# Altium PCB RF_v2.PcbDoc (part 1 of 4)
Units mm, origin at the board's own origin, x right, y up, seen from the top; angles counter-clockwise.
Board outline 203.1 x 72.1 mm, 2 copper layers (Top Layer, Bottom Layer), stack 1.535 mm thick; 384 components, 237 nets, 1087 pads, 1621 vias.
Unrouted connection lines stored in the file: 4.
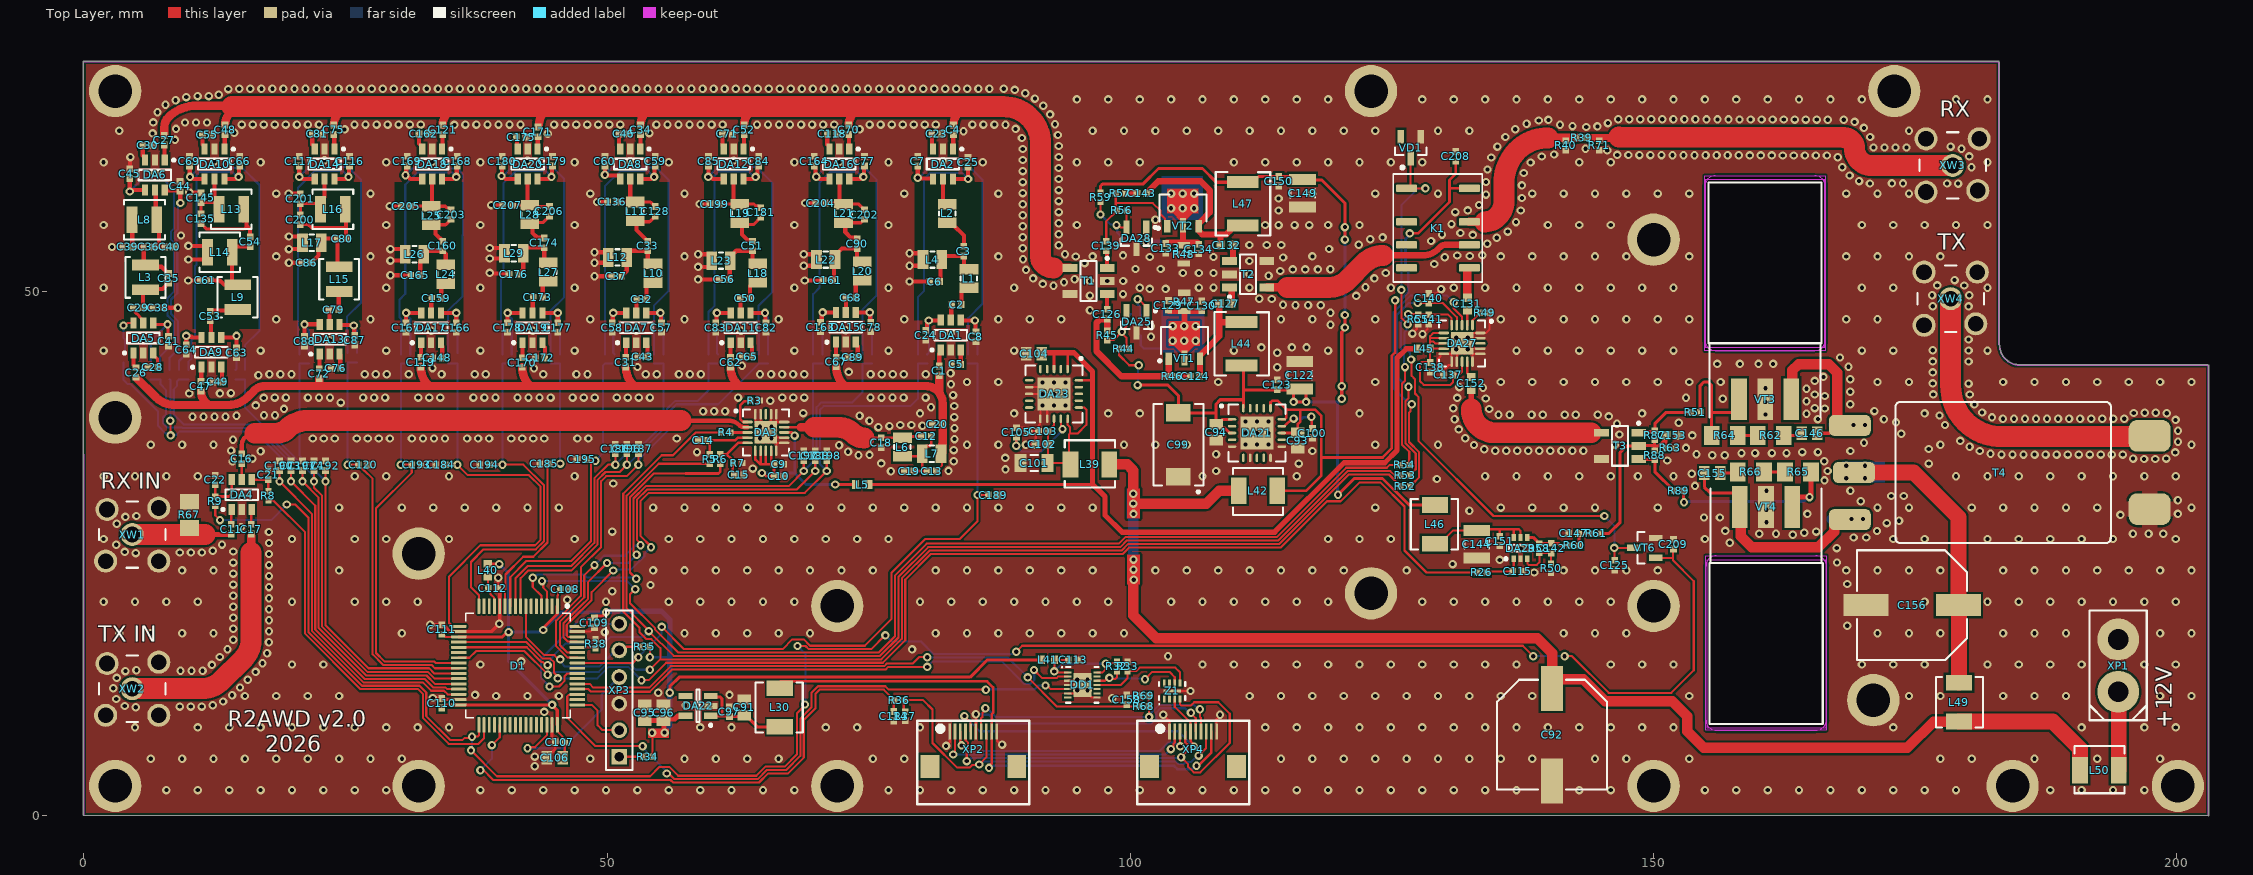
[diagram p0: Top Layer view]
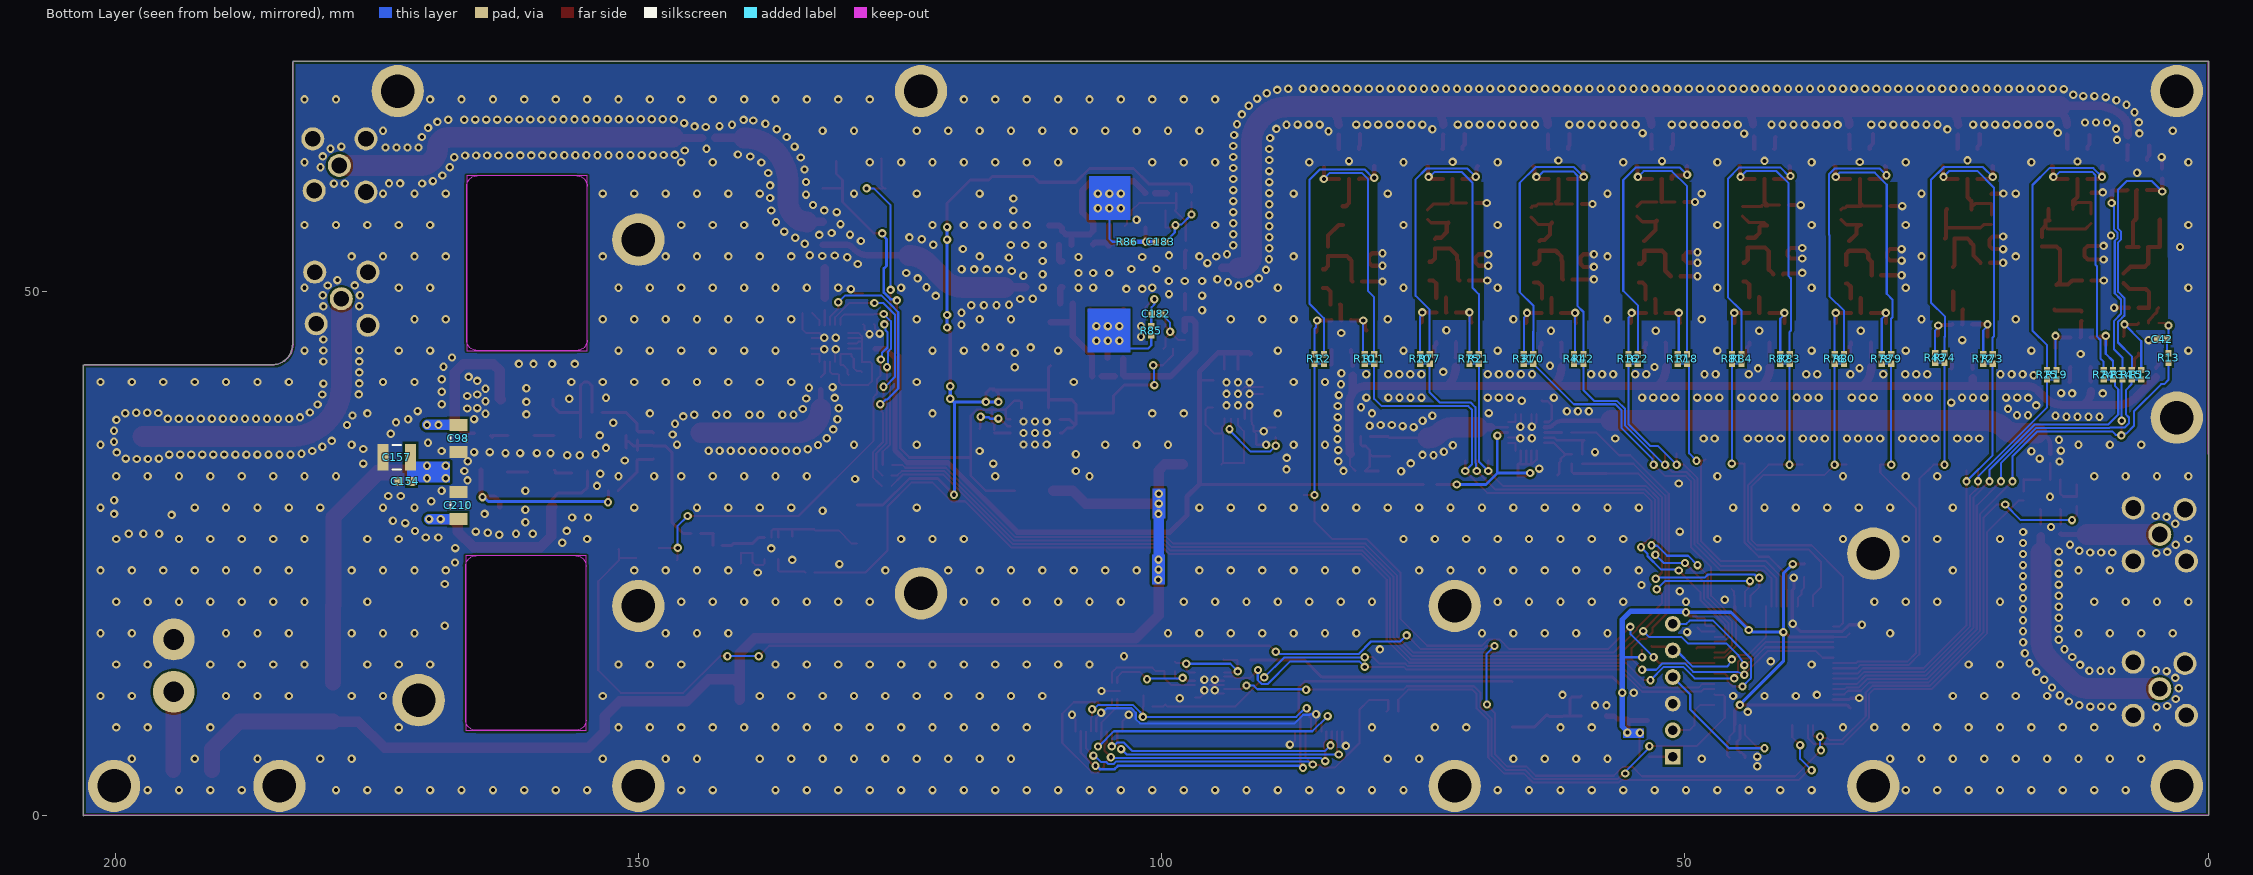
[diagram p1: Bottom Layer view, seen from below]
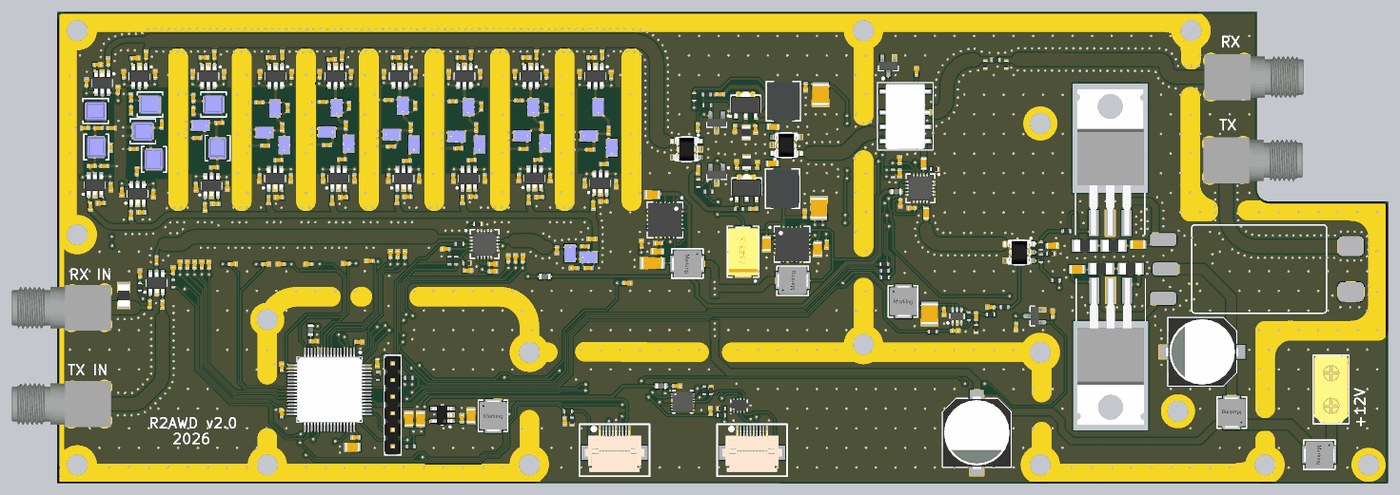
[diagram p4: 3D render of the assembled board from above, using the file's embedded part models]
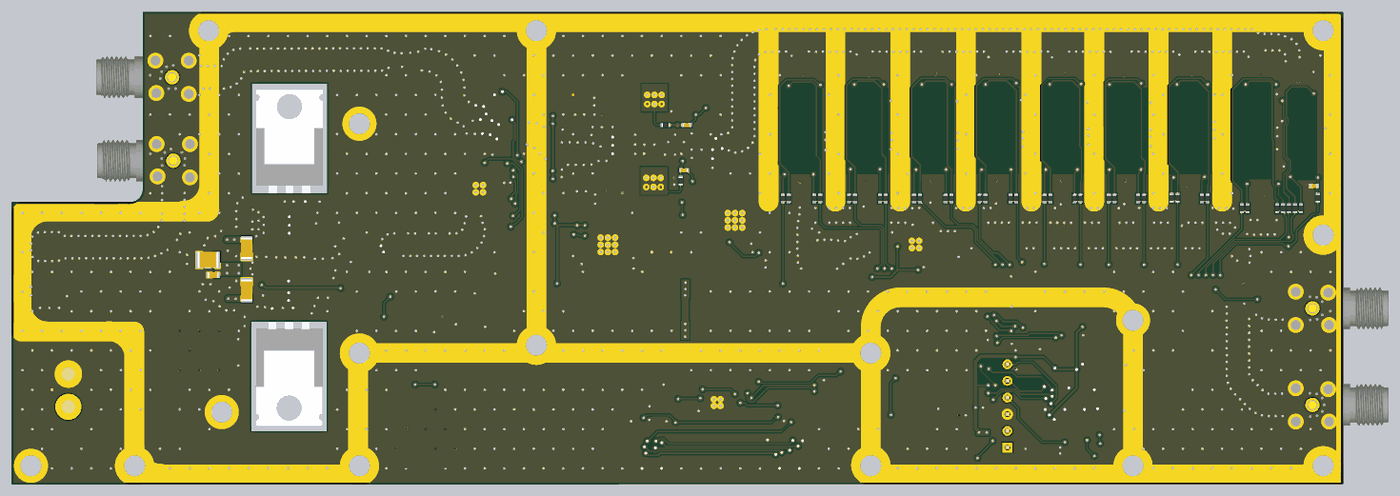
[diagram p5: 3D render of the assembled board from below, using the file's embedded part models]

## Layer stack, top to bottom
Top Solder: solder mask 0.0102, Solder Resist, Dk 3.5
Top Layer: signal copper 0.0175
Dielectric 1: dielectric 1.5, FR-4, Dk 4.8
Bottom Layer: signal copper 0.0175
Bottom Solder: solder mask 0.0102, Solder Resist, Dk 3.5

## Board outline
-0.05,0 -0.05,34.5 -0.05,72 0,72.05 183,72.05 183.05,71.981 183.05,45 ccw(c185,45) 185,43.05 202.946,43.05 203.05,43 203.05,0 202.999,-0.05
cut-out: 166.5,24.8 166.5,8.1 155,8.1 155,24.8
cut-out: 154.9,61.1 166.4,61.1 166.4,44.4 154.9,44.4

## Design rules (kind name [scope] priority, off if disabled: settings)
Clearance [All] p1: gap=0.125 ignorepadtopadclearanceinfootprint=FALSE except(0.2: Arc-Fill Arc-Poly Arc-Region Track-Fill Track-Poly Track-Region SMDPad-Fill SMDPad-Poly SMDPad-Region THPad-Fill THPad-Poly THPad-Region Via-Fill Via-Poly Via-Region Fill-Fill Fill-Poly Fill-Region Poly-Poly Poly-Region Region-Region)
HoleSize [All] p1: absolutevalues=TRUE maxlimit=5 minlimit=0.025 maxpercent=80.000 minpercent=20.000
PolygonConnect [All] p1: connectstyle=Direct reliefconductorwidth=0.254 reliefentries=4 polygonreliefangle="90 Angle" airgapwidth=0.254
RoutingVias [All] p1: holewidth=0.4 width=0.8 viastyle="Through Hole" minholewidth=0.3 minwidth=0.7 maxholewidth=4 maxwidth=6
SolderMaskExpansion [All] p1: expansion=0.102 istentingtop=FALSE
SupplyNets "Schematic Supply Nets_42" [InNet('IN_5V')] p1: voltage=0.000
SupplyNets "Schematic Supply Nets_31" [InNet('VDD_12VRF')] p2: voltage=0.000
SupplyNets "Schematic Supply Nets_41" [InNet('RELAY_TX')] p3: voltage=0.000
SupplyNets "Schematic Supply Nets_40" [InNet('BAND5_DIS')] p4: voltage=0.000
SupplyNets "Schematic Supply Nets_39" [InNet('BAND1_DIS')] p5: voltage=0.000
SupplyNets "Schematic Supply Nets_38" [InNet('BAND7_DIS')] p6: voltage=0.000
SupplyNets "Schematic Supply Nets_37" [InNet('BPF_IN')] p7: voltage=0.000
SupplyNets "Schematic Supply Nets_36" [InNet('BAND0_DIS')] p8: voltage=0.000
SupplyNets "Schematic Supply Nets_35" [InNet('BAND8_DIS')] p9: voltage=0.000
SupplyNets "Schematic Supply Nets_34" [InNet('BAND2_DIS')] p10: voltage=0.000
SupplyNets "Schematic Supply Nets_33" [InNet('BAND3_DIS')] p11: voltage=0.000
SupplyNets "Schematic Supply Nets_32" [InNet('BAND4_DIS')] p12: voltage=0.000
SupplyNets "Schematic Supply Nets_14" [InNet('BAND6_DIS')] p13: voltage=0.000
SupplyNets "Schematic Supply Nets_30" [InNet('DAC_DRV')] p14: voltage=0.000
SupplyNets "Schematic Supply Nets_29" [InNet('BAND3_EN')] p15: voltage=0.000
SupplyNets "Schematic Supply Nets_28" [InNet('VDD_RFIN')] p16: voltage=0.000
SupplyNets "Schematic Supply Nets_27" [InNet('CON_RS422B')] p17: voltage=0.000
SupplyNets "Schematic Supply Nets_26" [InNet('BAND8_EN')] p18: voltage=0.000
SupplyNets "Schematic Supply Nets_25" [InNet('BAND6_EN')] p19: voltage=0.000
SupplyNets "Schematic Supply Nets_24" [InNet('CON_RS422Z')] p20: voltage=0.000
SupplyNets "Schematic Supply Nets_23" [InNet('BAND1_EN')] p21: voltage=0.000
SupplyNets "Schematic Supply Nets_22" [InNet('RF_3V3')] p22: voltage=0.000
SupplyNets "Schematic Supply Nets_21" [InNet('BPF_OUT')] p23: voltage=0.000
SupplyNets "Schematic Supply Nets_20" [InNet('TX_EN')] p24: voltage=0.000
SupplyNets "Schematic Supply Nets_19" [InNet('DRV_IN')] p25: voltage=0.000
SupplyNets "Schematic Supply Nets_17" [InNet('ATT_LE0')] p26: voltage=0.000
SupplyNets "Schematic Supply Nets_16" [InNet('VDD_12V')] p27: voltage=0.000
SupplyNets "Schematic Supply Nets_15" [InNet('CON_TX_FAIL')] p28: voltage=0.000
SupplyNets "Schematic Supply Nets_13" [InNet('VDD_3V3')] p29: voltage=0.000
SupplyNets "Schematic Supply Nets_12" [InNet('BAND2_EN')] p30: voltage=0.000
SupplyNets "Schematic Supply Nets_11" [InNet('CON_TXON')] p31: voltage=0.000
SupplyNets "Schematic Supply Nets_10" [InNet('CON_RS422Y')] p32: voltage=0.000
SupplyNets "Schematic Supply Nets_9" [InNet('GND')] p33: voltage=0.000
SupplyNets "Schematic Supply Nets_8" [InNet('ATT_CLK')] p34: voltage=0.000
SupplyNets "Schematic Supply Nets_7" [InNet('ATT_DATA')] p35: voltage=0.000
SupplyNets "Schematic Supply Nets_6" [InNet('BAND7_EN')] p36: voltage=0.000
SupplyNets "Schematic Supply Nets_5" [InNet('ATT_LE1')] p37: voltage=0.000
SupplyNets "Schematic Supply Nets_4" [InNet('CON_RS422A')] p38: voltage=0.000
SupplyNets "Schematic Supply Nets_3" [InNet('RX_EN')] p39: voltage=0.000
SupplyNets "Schematic Supply Nets_2" [InNet('BAND0_EN')] p40: voltage=0.000
SupplyNets "Schematic Supply Nets_1" [InNet('BAND4_EN')] p41: voltage=0.000
SupplyNets "Schematic Supply Nets" [InNet('BAND5_EN')] p42: voltage=0.000
Width [All] p1: maxlimit=5 minlimit=0.125 preferedwidth=0.2
29 further rules are at their usual default settings.

## Classes and differential pairs
component class RF_pwr_v2: C73 C74 C91 C92 C95 C96 C97 C101 C102 C103 C104 C105 C106 C107 C108 C109 C110 C111 C112 C113 C114 C120 C158 C184 C185 C186 C187 C188 C189 C190 C191 C192 C193 C194 C195 C196 C197 C198 D1 DA22 DA23 DD1 L30 L39 L40 L41 L50 R32 R33 R34 R35 R36 R37 R38 R68 R69 XP1 XP2 XP3 XP4 Z1
component class RF_in_v2: C1 C2 C3 C4 C5 C6 C7 C8 C9 C10 C11 C12 C13 C14 C15 C16 C17 C18 C19 C20 C21 C22 C23 C24 C25 C26 C27 C28 C29 C30 C31 C32 C33 C34 C35 C36 C37 C38 C39 C40 C41 C42 C43 C44 C45 C46 C47 C48 C49 C50 C51 C52 C53 C54 C55 C56 C57 C58 C59 C60 C61 C62 C63 C64 C65 C66 C67 C68 C69 C70 C71 C72 C75 C76 C77 C78 C79 C80 C81 C82 C83 C84 C85 C86 C87 C88 C89 C90 C116 C117 C118 C119 C121 C128 C135 C136 C145 C148 C159 C160 C161 C162 C163 C164 C165 C166 C167 C168 C169 C170 C171 C172 C173 C174 C175 C176 C177 C178 C179 C180 C181 C199 C200 C201 C202 C203 C204 C205 C206 C207 DA1 DA2 DA3 DA4 DA5 DA6 DA7 DA8 DA9 DA10 DA11 DA12 DA13 DA14 DA15 DA16 DA17 DA18 DA19 DA20 L1 L2 L3 L4 L5 L6 L7 L8 L9 L10 L11 L12 L13 L14 L15 L16 L17 L18 L19 L20 L21 L22 L23 L24 L25 L26 L27 L28 L29 R1 R2 R3 R4 R5 R6 R7 R8 R9 R10 R11 R12 R13 R14 R15 R16 R17 R18 R19 R20 R21 R22 R23 R24 R25 R31 R41 R42 R43 R67 R70 R72 R73 R74 R75 R76 R77 R78 R79 R80 R81 R82 R83 R84 XW1 XW2
component class RF_drv_v2: C93 C94 C98 C99 C100 C115 C122 C123 C124 C125 C126 C127 C129 C130 C131 C132 C133 C134 C137 C138 C139 C140 C141 C142 C143 C144 C146 C147 C149 C150 C151 C152 C153 C154 C155 C156 C157 C182 C183 C208 C209 C210 DA21 DA25 DA27 DA28 DA29 K1 L42 L44 L45 L46 L47 L49 R26 R39 R40 R44 R45 R46 R47 R48 R49 R50 R51 R52 R53 R54 R55 R56 R57 R58 R59 R60 R61 R62 R63 R64 R65 R66 R71 R85 R86 R87 R88 R89 T1 T2 T3 T4 VD1 VT1 VT2 VT3 VT4 VT6 XW3 XW4

## Components (designator, comment, footprint, x,y, rotation, side; value= is the part's Value field where it differs from the comment)
C1 "0.1мк" CAPC1005X06N 81.75,42.475 r270 top
C2 "15" CAPC1005X06N 83.4,48.8 r0 top
C3 "15" CAPC1005X06N 84.1,53.9 r90 top
C4 "0.1мк" CAPC1005X06N 83.1,65.5 r270 top
C5 "0.1мк" CAPC1005X06N 83.35,43.075 r180 top
C6 "180" CAPC1005X06N 81.3,51 r0 top
C7 "0.1мк" CAPC1005X06N 79.7,62.5 r90 top
C8 "0.1мк" CAPC1005X06N 85.25,45.735 r270 top
C9 "100" CAPC1005X06N 66.419,33.528 r180 top
C10 "0.1мк" CAPC1005X06N 66.419,32.385 r180 top
C11 "0.1мк" CAPC1005X06N 14.089,27.34 r270 top
C12 "13" CAPC1005X06N 80.516,36.195 r180 top
C13 "43" CAPC1005X06N 81.024,32.893 r180 top
C14 "100" CAPC1005X06N 59.18,35.814 r0 top
C15 "100" CAPC1005X06N 62.609,32.512 r180 top
C16 "0.1мк" CAPC1005X06N 15.105,34.071 r270 top
C17 "0.1мк" CAPC1005X06N 15.994,27.34 r270 top
C18 "56" CAPC1005X06N 76.2,35.6 r90 top
C19 "91" CAPC1005X06N 78.865,32.893 r0 top
C20 "39" CAPC1005X06N 81.532,37.338 r0 top
C21 "0.1мк" CAPC1005X06N 17.645,32.547 r90 top
C22 "0.1мк" CAPC1005X06N 12.565,32.039 r90 top
C23 "0.1мк" CAPC1005X06N 81.5,65.1 r0 top
C24 "0.1мк" CAPC1005X06N 80.45,45.875 r270 top
C25 "0.1мк" CAPC1005X06N 84.5,62.4 r90 top
C26 "0.1мк" CAPC1005X06N 5,42.3 r270 top
C27 "0.1мк" CAPC1005X06N 7.7,64.5 r270 top
C28 "0.1мк" CAPC1005X06N 6.6,42.8 r180 top
C29 "0.1мк" CAPC1005X06N 5.2,48.5 r180 top
C30 "0.1мк" CAPC1005X06N 6.1,64 r180 top
C31 "0.1мк" CAPC1005X06N 51.8,43.3 r270 top
C32 "220" CAPC1005X06N 53.3,49.3 r0 top
C33 "220" CAPC1005X06N 53.9,54.4 r90 top
C34 "0.1мк" CAPC1005X06N 53.2,65.5 r270 top
C35 "47" CAPC1005X06N 8.1,51.3 r90 top
C36 "120" CAPC1005X06N 6.2,54.3 r0 top
C37 "820" CAPC1005X06N 50.9,51.5 r0 top
C38 "1800" CAPC1005X06N 7.1,48.5 r180 top
C39 "3300" CAPC1005X06N 4.2,54.3 r0 top
C40 "1800" CAPC1005X06N 8.2,54.3 r180 top
C41 "0.1мк" CAPC1005X06N 8.1,45.3 r270 top
C42 "0.1мк" CAPC1005X06N 4.4,45.5 r0 bottom
C43 "0.1мк" CAPC1005X06N 53.4,43.8 r180 top
C44 "0.1мк" CAPC1005X06N 9.2,60.1 r90 top
C45 "0.1мк" CAPC1005X06N 4.4,61.3 r90 top
C46 "0.1мк" CAPC1005X06N 51.6,65.1 r180 top
C47 "0.1мк" CAPC1005X06N 11.2,41 r270 top
C48 "0.1мк" CAPC1005X06N 13.5,65.5 r270 top
C49 "0.1мк" CAPC1005X06N 12.8,41.4 r180 top
C50 "100" CAPC1005X06N 63.2,49.4 r0 top
C51 "100" CAPC1005X06N 63.9,54.4 r90 top
C52 "0.1мк" CAPC1005X06N 63.1,65.5 r270 top
C53 "1000" CAPC1005X06N 12.1,47.7 r90 top
C54 "1000" CAPC1005X06N 15.9,54.8 r90 top
C55 "0.1мк" CAPC1005X06N 11.8,65 r180 top
C56 "820" CAPC1005X06N 61.2,51.2 r0 top
C57 "0.1мк" CAPC1005X06N 55.2,46.6 r270 top
C58 "0.1мк" CAPC1005X06N 50.5,46.6 r270 top
C59 "0.1мк" CAPC1005X06N 54.6,62.5 r90 top
C60 "0.1мк" CAPC1005X06N 49.8,62.5 r90 top
C61 "4700" CAPC1005X06N 11.6,51.1 r0 top
C62 "0.1мк" CAPC1005X06N 61.8,43.3 r270 top
C63 "0.1мк" CAPC1005X06N 14.6,44.2 r270 top
C64 "0.1мк" CAPC1005X06N 9.8,44.5 r270 top
C65 "0.1мк" CAPC1005X06N 63.4,43.8 r180 top
C66 "0.1мк" CAPC1005X06N 14.9,62.5 r90 top
C67 "0.1мк" CAPC1005X06N 71.9,43.31 r270 top
C68 "100" CAPC1005X06N 73.3,49.45 r0 top
C69 "0.1мк" CAPC1005X06N 10.1,62.5 r90 top
C70 "0.1мк" CAPC1005X06N 73.1,65.5 r270 top
C71 "0.1мк" CAPC1005X06N 61.5,65.1 r180 top
C72 "0.1мк" CAPC1005X06N 22.5,42.2 r270 top
C73 "0.01мк" CAPC1005X06N 19.8,33.4 r270 top
C74 "0.01мк" CAPC1005X06N 22,33.4 r270 top
C75 "0.1мк" CAPC1005X06N 23.9,65.5 r270 top
C76 "0.1мк" CAPC1005X06N 24.1,42.7 r180 top
C77 "0.1мк" CAPC1005X06N 74.6,62.5 r90 top
C78 "0.1мк" CAPC1005X06N 75.2,46.65 r270 top
C79 "560" CAPC1005X06N 23.9,48.3 r0 top
C80 "560" CAPC1005X06N 24.7,55.1 r0 top
C81 "0.1мк" CAPC1005X06N 22.3,65.1 r180 top
C82 "0.1мк" CAPC1005X06N 65.2,46.6 r270 top
C83 "0.1мк" CAPC1005X06N 60.4,46.6 r270 top
C84 "0.1мк" CAPC1005X06N 64.5,62.5 r90 top
C85 "0.1мк" CAPC1005X06N 59.7,62.5 r90 top
C86 "3300" CAPC1005X06N 21.3,52.8 r0 top
C87 "0.1мк" CAPC1005X06N 25.9,45.4 r270 top
C88 "0.1мк" CAPC1005X06N 21.1,45.3 r270 top
C89 "0.1мк" CAPC1005X06N 73.5,43.75 r180 top
C90 "100" CAPC1005X06N 73.9,54.6 r90 top
C91 "22мк" CAPC2012X12L 63.1,10.3 r270 top
C92 "470мк" CAPAE116103X105N 140.3,7.7 r270 top
C93 "22мк" CAPC2012X12L 116,35.8 r90 top
C94 "22мк" CAPC2012X12L 108.2,36.6 r90 top
C95 "22мк" CAPC2012X12L 53.6,9.8 r270 top
C96 "22мк" CAPC2012X12L 55.4,9.8 r270 top
C97 "1мк" CAPC1005X06N 61.7,9.9 r270 top
C98 "47" CAPC3216X19L 167.2,36 r270 bottom
C99 "47мк" CAPMP7343X28L 104.6,35.4 r270 top
C100 "1мк" CAPC1005X06N 117.4,36.5 r90 top
C101 "100мк" CAPC3216X19L 90.805,33.655 r0 top
C102 "10мк" CAPC1608X08L 91.567,35.433 r0 top
C103 "0.1мк" CAPC1005X06N 91.694,36.703 r0 top
C104 "47мк" CAPC2012X12L 90.8,44.1 r0 top
C105 "1мк" CAPC1005X06N 89.125,36.575 r270 top
C106 "22мк" CAPC2012X12L 45,5.5 r0 top
C107 "0.1мк" CAPC1005X06N 45.5,7 r0 top
C108 "0.1мк" CAPC1005X06N 46,21.6 r180 top
C109 "0.1мк" CAPC1005X06N 48.8,18.4 r90 top
C110 "0.1мк" CAPC1005X06N 34.2,10.7 r270 top
C111 "0.1мк" CAPC1005X06N 34.2,17.751 r270 top
C112 "0.1мк" CAPC1005X06N 39.1,21.7 r180 top
C113 "1мк" CAPC1005X06N 94.536,14.863 r180 top
C114 "0.01мк" CAPC1005X06N 77.4,9.46 r90 top
C115 "0.1мк" CAPC1005X06N 137,23.3 r0 top
C116 "0.1мк" CAPC1005X06N 25.4,62.5 r90 top
C117 "0.1мк" CAPC1005X06N 20.6,62.5 r90 top
C118 "0.1мк" CAPC1005X06N 71.5,65.1 r180 top
C119 "0.1мк" CAPC1005X06N 32.2,43.3 r270 top
C120 "0.01мк" CAPC1005X06N 26.7,33.5 r180 top
C121 "0.1мк" CAPC1005X06N 34.3,65.5 r270 top
C122 "10мк" CAPC3225X27L 116.205,42.037 r270 top
C123 "0.1мк" CAPC1005X06N 114.046,41.148 r90 top
C124 "0.01мк" CAPC1005X06N 106.184,41.946 r0 top
C125 "0.1мк" CAPC1005X06N 146.3,23.9 r270 top
C126 "0.1мк" CAPC1005X06N 97.79,47.879 r90 top
C127 "0.1мк" CAPC1608X08L 109.093,48.895 r180 top
C128 "27" CAPC1005X06N 54.6,57.7 r90 top
C129 "0.01мк" CAPC1005X06N 103.644,48.725 r90 top
C130 "0.1мк" CAPC1005X06N 106.819,48.677 r90 top
C131 "0.1мк" CAPC1608X08L 132.207,48.86 r90 top
C132 "0.1мк" CAPC1608X08L 109.22,54.483 r180 top
C133 "0.01мк" CAPC1005X06N 103.378,54.181 r90 top
C134 "0.1мк" CAPC1005X06N 106.553,54.102 r90 top
C135 "120" CAPC1005X06N 11.2,57 r90 top
C136 "180" CAPC1005X06N 50.5,58.6 r0 top
C137 "100" CAPC1005X06N 130.375,42.075 r0 top
C138 "0.1мк" CAPC1005X06N 128.651,42.799 r90 top
C139 "0.1мк" CAPC1005X06N 97.7,54.4 r270 top
C140 "100" CAPC1005X06N 128.524,49.403 r270 top
C141 "100" CAPC1005X06N 128.524,47.371 r90 top
C142 "1000" CAPC1005X06N 140.208,25.527 r90 top
C143 "0.01мк" CAPC1005X06N 101.092,59.436 r0 top
C144 "10мк" CAPC3225X27L 133.1,25.9 r90 top
C145 "820" CAPC1005X06N 11.2,59 r270 top
C146 "0,01мк" CAPC2012X12L 164.9,36.5 r180 top
C147 "0.1мк" CAPC1005X06N 142.367,26.924 r180 top
C148 "0.1мк" CAPC1005X06N 33.8,43.7 r180 top
C149 "10мк" CAPC3225X27L 116.459,59.436 r90 top
C150 "0.1мк" CAPC1005X06N 114.173,60.579 r270 top
C151 "0.1мк" CAPC1005X06N 135.3,26.2 r270 top
C152 "0.1мк" CAPC1608X08L 132.575,41.275 r90 top
C153 "0.1мк" CAPC1608X08L 151.8,36.3 r180 top
C154 "0.1мк" CAPC1608X08L 172.3,31.9 r180 bottom
C155 "0,01мк" CAPC2012X12L 155.6,32.7 r0 top
C156 "470мк" CAPAE116103X105N 174.7,20.075 r180 top
C157 "10мк" CAPC3225X27L 173.1,34.2 r180 bottom
C158 "0.01мк" CAPC1005X06N 99.656,11.038 r270 top
C159 "680" CAPC1005X06N 33.7,49.4 r0 top
C160 "560" CAPC1005X06N 34.3,54.4 r90 top
C161 "390" CAPC1005X06N 71.1,51.1 r0 top
C162 "0.1мк" CAPC1005X06N 32.5,65.1 r180 top
C163 "0.1мк" CAPC1005X06N 70.4,46.65 r270 top
C164 "0.1мк" CAPC1005X06N 69.8,62.5 r90 top
C165 "1200" CAPC1005X06N 31.7,51.6 r0 top
C166 "0.1мк" CAPC1005X06N 35.6,46.6 r270 top
C167 "0.1мк" CAPC1005X06N 30.8,46.6 r270 top
C168 "0.1мк" CAPC1005X06N 35.7,62.5 r90 top
C169 "0.1мк" CAPC1005X06N 30.9,62.5 r90 top
C170 "0.1мк" CAPC1005X06N 41.9,43.26 r270 top
C171 "0.1мк" CAPC1005X06N 43.4,65.3 r270 top
C172 "0.1мк" CAPC1005X06N 43.6,43.7 r180 top
C173 "180" CAPC1005X06N 43.4,49.5 r0 top
C174 "180" CAPC1005X06N 44,54.7 r90 top
C175 "0.1мк" CAPC1005X06N 41.8,64.8 r180 top
C176 "1800" CAPC1005X06N 41.1,51.7 r0 top
C177 "0.1мк" CAPC1005X06N 45.3,46.6 r270 top
C178 "0.1мк" CAPC1005X06N 40.5,46.6 r270 top
C179 "0.1мк" CAPC1005X06N 44.8,62.5 r90 top
C180 "0.1мк" CAPC1005X06N 40,62.5 r90 top
C181 "18" CAPC1005X06N 64.7,57.6 r90 top
C182 "0.1мк" CAPC1005X06N 100.5,47.9 r0 bottom
C183 "0.1мк" CAPC1005X06N 100.1,54.8 r180 bottom
C184 "0.01мк" CAPC1005X06N 34.1,33.5 r0 top
C185 "0.01мк" CAPC1005X06N 44.023,33.6 r0 top
C186 "0.01мк" CAPC1005X06N 50.8,35 r270 top
C187 "0.01мк" CAPC1005X06N 53,35 r270 top
C188 "0.01мк" CAPC1005X06N 69.9,34.36 r270 top
C189 "0.01мк" CAPC1005X06N 86.9,30.6 r180 top
C190 "0.01мк" CAPC1005X06N 18.7,33.4 r270 top
C191 "0.01мк" CAPC1005X06N 20.9,33.4 r270 top
C192 "0.01мк" CAPC1005X06N 23.1,33.4 r270 top
C193 "0.01мк" CAPC1005X06N 31.8,33.5 r180 top
C194 "0.01мк" CAPC1005X06N 38.311,33.5 r0 top
C195 "0.01мк" CAPC1005X06N 47.6,34 r0 top
C196 "0.01мк" CAPC1005X06N 51.9,35 r270 top
C197 "0.01мк" CAPC1005X06N 68.8,34.36 r270 top
C198 "0.01мк" CAPC1005X06N 71,34.36 r270 top
C199 "91" CAPC1005X06N 60.3,58.4 r0 top
C200 "68" CAPC1005X06N 20.7,56.9 r90 top
C201 "470" CAPC1005X06N 20.7,58.9 r270 top
C202 "12" CAPC1005X06N 74.6,57.4 r90 top
C203 "56" CAPC1005X06N 35.1,57.4 r90 top
C204 "82" CAPC1005X06N 70.4,58.5 r0 top
C205 "220" CAPC1005X06N 30.8,58.2 r0 top
C206 "22" CAPC1005X06N 44.5,57.7 r90 top
C207 "180" CAPC1005X06N 40.5,58.3 r0 top
C208 "0.1мк" CAPC1005X06N 131.1,62.96 r90 top
C209 "1000" CAPC1005X06N 151.9,25.9 r90 top
C210 "47" CAPC3216X19L 167.2,29.6 r90 bottom
D1 "STM32F103RCT6" QFP50P1200X1200X160-64N 41.5,14.3 r270 top
DA1 "AS169-73" SOT95P270X145-6N 82.85,45.875 r90 top
DA2 "AS169-73" SOT95P270X145-6N 82.1,62.226 r270 top
DA3 "PE4312C-Z" QFN50P400X400X80_HS-21L 65.177,36.576 r0 top
DA4 "AS169-73" SOT95P270X145-6N 15.105,30.642 r90 top
DA5 "AS169-73" SOT95P270X145-6N 5.7,45.6 r90 top
DA6 "AS169-73" SOT95P270X145-6N 6.8,61.178 r270 top
DA7 "AS169-73" SOT95P270X145-6N 52.8,46.574 r90 top
DA8 "AS169-73" SOT95P270X145-6N 52.221,62.226 r270 top
DA9 "AS169-73" SOT95P270X145-6N 12.2,44.237 r90 top
DA10 "AS169-73" SOT95P270X145-6N 12.497,62.226 r270 top
DA11 "AS169-73" SOT95P270X145-6N 62.769,46.574 r90 top
DA12 "AS169-73" SOT95P270X145-6N 62.1,62.226 r270 top
DA13 "AS169-73" SOT95P270X145-6N 23.499,45.491 r90 top
DA14 "AS169-73" SOT95P270X145-6N 23.011,62.226 r270 top
DA15 "AS169-73" SOT95P270X145-6N 72.819,46.624 r90 top
DA16 "AS169-73" SOT95P270X145-6N 72.2,62.226 r270 top
DA17 "AS169-73" SOT95P270X145-6N 33.189,46.574 r90 top
DA18 "AS169-73" SOT95P270X145-6N 33.29,62.226 r270 top
DA19 "AS169-73" SOT95P270X145-6N 42.884,46.574 r90 top
DA20 "AS169-73" SOT95P270X145-6N 42.415,62.226 r270 top
DA21 "TPS7A4700" QFN65P500X500X100_HS-21L 112.1,36.525 r0 top
DA22 "LP5907MFX-3.3" SOT23-5AM 58.7,10.45 r180 top
DA23 "TPS7A4700" QFN65P500X500X100_HS-21L 92.71,40.259 r270 top
DA25 "TLVH431AIDBZR" SOT23_N 100.596,47.153 r270 top
DA27 "PE4312C-Z" QFN50P400X400X80_HS-21L 131.699,45.085 r270 top
DA28 "TLVH431AIDBZR" SOT23_N 100.584,55.118 r270 top
DA29 "MAX4231AXT-T" TSOP65P210X100-6L 137.287,25.527 r90 top
DD1 "MAX13433EETD+" SON40P300X80_HS-15L 95.425,12.45 r0 top
K1 "IM06GR" "IM Relay GR" 129.4,59.9 r270 top
L1 "560нГн" INDC0805CS 84.582,51.284 r90 top
L2 "560нГн" INDC0805CS 82.5,57.5 r90 top
L3 "5,6мкГн" Coilcraft-1008CS 5.9,51.4 r90 top
L4 "47нГн" INDC0805CS 81.09,53.1 r0 top
L5 "BLM18PG121SN1D" INDC1608X08L 74.368,31.6 r0 top
L6 "150нГн" INDC0805CS 78.23,35.179 r270 top
L7 "110нГн" INDC0805CS 81.025,34.544 r0 top
L8 "5,6мкГн" Coilcraft-1008CS 5.8,56.9 r0 top
L9 "5,6мкГн" Coilcraft-1008CS 14.7,49.5 r90 top
L10 "1мкГн" INDC0805CS 54.4,51.8 r90 top
L11 "1мкГн" INDC0805CS 52.7,57.7 r90 top
L12 "270нГн" INDC0805CS 51,53.3 r0 top
L13 "5,6мкГн" Coilcraft-1008CS 14.1,57.9 r180 top
L14 "1,2мкГн" Coilcraft-1008CS 13,53.8 r180 top
L15 "3,9мкГн" Coilcraft-1008CS 24.4,51.22 r90 top
L16 "3,9мкГн" Coilcraft-1008CS 23.8,57.9 r180 top
L17 "680нГн" INDC0805CS 21.8,54.7 r180 top
L18 "1мкГн" INDC0805CS 64.4,51.81 r90 top
L19 "1мкГн" INDC0805CS 62.7,57.5 r90 top
L20 "470нГн" INDC0805CS 74.4,52 r90 top
L21 "470нГн" INDC0805CS 72.6,57.5 r90 top
L22 "120нГн" INDC0805CS 70.9,53.1 r180 top
L23 "120нГн" INDC0805CS 60.9,53 r0 top
L24 "1.5мкГн" INDC0805CS 34.6,51.7 r90 top
L25 "1,8мкГн" INDC0805CS 33.2,57.3 r90 top
L26 "680нГн" INDC0805CS 31.6,53.6 r180 top
L27 "2.2мкГн" INDC0805CS 44.4,51.9 r90 top
L28 "2.2мкГн" INDC0805CS 42.6,57.4 r90 top
L29 "220нГн" INDC0805CS 41.1,53.7 r180 top
L30 "2,2мкГн" CSAB0420 66.5,10.3 r270 top
L39 "2,2мкГн" CSAB0420 96.139,33.528 r180 top
L40 "BLM18PG121SN1D" INDC1608X08L 38.6,23.4 r90 top
L41 "BLM18PG121SN1D" INDC1608X08L 92.125,14.85 r0 top
L42 "2,2мкГн" CSAB0420 112.2,31 r0 top
L44 "15мкГн" Coilcraft-1812FS 110.617,45.047 r90 top
L45 "BLM18PG121SN1D" INDC1608X08L 128.016,44.577 r180 top
L46 "2,2мкГн" CSAB0420 129.1,27.8 r270 top
L47 "15мкГн" Coilcraft-1812FS 110.744,58.42 r90 top
L49 "2,2мкГн" CSAB0420 179.175,10.8 r90 top
L50 "2,2мкГн" CSAB0420 192.6,4.3 r180 top
R1 "100" RESC1005X06N 85.4,43.6 r270 bottom
R2 "100" RESC1005X06N 84.5,43.6 r270 bottom
R3 "10к" RESC1005X06N 64.133,39.624 r180 top
R4 "10к" RESC1005X06N 61.339,36.576 r180 top
R5 "100" RESC1005X06N 59.815,34.036 r270 top
R6 "100" RESC1005X06N 60.831,34.036 r270 top
R7 "10к" RESC1005X06N 62.482,33.655 r0 top
R8 "100" RESC1005X06N 17.645,30.515 r270 top
R9 "100" RESC1005X06N 12.565,30.007 r270 top
R10 "100" RESC1005X06N 80.6,43.6 r270 bottom
R11 "100" RESC1005X06N 79.7,43.6 r270 bottom
R12 "100" RESC1005X06N 6.4,42.1 r270 bottom
R13 "100" RESC1005X06N 3.8,43.7 r270 bottom
R14 "100" RESC1005X06N 8.2,42.1 r90 bottom
R15 "100" RESC1005X06N 7.3,42.1 r90 bottom
R16 "100" RESC1005X06N 55.4,43.6 r270 bottom
R17 "100" RESC1005X06N 50.7,43.6 r270 bottom
R18 "100" RESC1005X06N 49.8,43.6 r90 bottom
R19 "100" RESC1005X06N 14.5,42.1 r270 bottom
R20 "100" RESC1005X06N 75.3,43.6 r270 bottom
R21 "100" RESC1005X06N 69.7,43.6 r90 bottom
R22 "100" RESC1005X06N 54.5,43.6 r90 bottom
R23 "100" RESC1005X06N 9.1,42.1 r270 bottom
R24 "100" RESC1005X06N 10,42.1 r90 bottom
R25 "100" RESC1005X06N 15.4,42.1 r90 bottom
R26 "240" RESC1005X06N 133.6,23.2 r0 top
R31 "100" RESC1005X06N 65.4,43.6 r270 bottom
R32 "180к" RESC1005X06N 98.719,14.22 r90 top
R33 "180к" RESC1005X06N 99.735,14.22 r270 top
R34 "100" RESC1005X06N 53.9,5.6 r180 top
R35 "10к" RESC1005X06N 53.6,16.1 r0 top
R36 "100" RESC1005X06N 77.9,11 r180 top
R37 "10к" RESC1005X06N 78.5,9.45 r270 top
R38 "100" RESC1005X06N 48.9,16.4 r90 top
R39 "0" RESC1005X06N 143.129,64.732 r0 top
R40 "*" RESC1005X06N 141.6,64 r270 top
R41 "100" RESC1005X06N 60.6,43.6 r270 bottom
R42 "100" RESC1005X06N 59.7,43.6 r90 bottom
R43 "100" RESC1005X06N 26.1,43.7 r270 bottom
R44 "3.3к" RESC1005X06N 99.372,44.577 r180 top
R45 "1к" RESC1005X06N 97.79,45.847 r90 top
R46 "2.2к" RESC1005X06N 104.025,41.946 r180 top
R47 "18" RESC2012X05L 105.168,49.058 r90 top
R48 "18" RESC2012X05L 105.1,53.6 r90 top
R49 "10к" RESC1005X06N 133.858,48.006 r180 top
R50 "22к" RESC1005X06N 140.2,23.6 r90 top
R51 "10" RESC1005X06N 154,38.5 r0 top
R52 "10к" RESC1005X06N 126.275,31.45 r180 top
R53 "100" RESC1005X06N 126.25,32.475 r180 top
R54 "100" RESC1005X06N 126.2,33.475 r180 top
R55 "10к" RESC1005X06N 127.508,47.371 r270 top
R56 "1к" RESC1005X06N 99.187,57.785 r0 top
R57 "2.2к" RESC1005X06N 99.06,59.436 r0 top
R58 "39к" RESC1005X06N 139.065,25.527 r90 top
R59 "3.3к" RESC1005X06N 97.155,59.055 r270 top
R60 "240" RESC1005X06N 142.436,25.781 r0 top
R61 "240" RESC1005X06N 144.526,26.924 r0 top
R62 "390" RESC3216X04L 161.2,36.3 r0 top
R63 "100к" RESC1005X06N 151.6,35.1 r0 top
R64 "1,5к" RESC3216X04L 156.8,36.3 r0 top
R65 "1,5к" RESC3216X04L 163.8,32.8 r0 top
R66 "390" RESC3216X04L 159.3,32.8 r180 top
R67 "100к" RESC3216X04L 10.1,28.7 r90 top
R68 "100" RESC1005X06N 101.307,10.403 r180 top
R69 "10к" RESC1005X06N 101.307,11.419 r180 top
R70 "100" RESC1005X06N 64.5,43.6 r90 bottom
R71 "*" RESC1005X06N 144.8,64 r270 top
R72 "100" RESC1005X06N 21.5,43.6 r270 bottom
R73 "100" RESC1005X06N 20.6,43.6 r90 bottom
R74 "100" RESC1005X06N 25.2,43.7 r90 bottom
R75 "100" RESC1005X06N 70.6,43.6 r270 bottom
R76 "100" RESC1005X06N 35.7,43.6 r270 bottom
R77 "100" RESC1005X06N 74.4,43.6 r90 bottom
R78 "100" RESC1005X06N 31.2,43.6 r270 bottom
R79 "100" RESC1005X06N 30.3,43.6 r90 bottom
R80 "100" RESC1005X06N 34.8,43.6 r90 bottom
R81 "100" RESC1005X06N 45.5,43.6 r270 bottom
R82 "100" RESC1005X06N 40.9,43.6 r270 bottom
R83 "100" RESC1005X06N 40,43.6 r90 bottom
R84 "100" RESC1005X06N 44.6,43.6 r90 bottom
R85 "510" RESC1005X06N 101,46.3 r270 bottom
R86 "510" RESC1005X06N 103.3,54.8 r0 bottom
R87 "1к" RESC1005X06N 150.1,36.3 r270 top
R88 "1к" RESC1005X06N 150.1,34.4 r270 top
R89 "10" RESC1005X06N 152.4,31 r0 top
T1 "MABAES0060" "SM-22 package" 96.012,51.054 r180 top
T2 "MABAES0060" "SM-22 package" 111.252,51.689 r0 top
T3 "MABAES0060" "SM-22 package" 146.8,35.3 r180 top
T4 "Трансформатор PUM_OUT" TRANSFORMER_KV_PA20_0UT_2XBN-43-302_V1 183.4,32.75 r180 top
VD1 "BAS16" SOT23_N 126.8,63.8 r270 top
VT1 "RD01MUS2" SOT89-150P330X160-3N 105.168,45.121 r90 top
VT2 "RD01MUS2" SOT89-150P330X160-3N 105.029,57.785 r90 top
VT3 "RD06HHF1" TO-220HS 160.655,39.751 r0 top
VT4 "RD06HHF1" TO-220HS 160.742,29.464 r180 top
VT6 "PDTC114ET" SOT23_N 149.15,25.55 r180 top
XP1 "XT30UPB-M" XT30UPB-M 194.4,14.3 r90 top
XP2 "FH12-10S-0.5SVA" FH12-10S-0.5SH 85,8 r0 top
XP3 "PLS-6" HDR1X6 51.167,5.588 r90 top
XP4 "FH12-10S-0.5SVA" FH12-10S-0.5SH 106,8 r0 top
XW1 "SMA-JR" SMA-JR 4.633,26.824 r270 top
XW2 "SMA-JR" SMA-JR 4.633,12.092 r270 top
XW3 "SMA-JR" SMA-JR 178.575,62.09 r90 top
XW4 "SMA-JR" SMA-JR 178.387,49.358 r90 top
Z1 "EClamp2394P" SON50P160X65_HS-9N 104,11.875 r90 top

## Footprints (in the part's own frame and the unit in brackets; to place one, negate y for a bottom-side part, rotate by r counter-clockwise, add the part's x,y. Pads: shape width x height; smd on the part's side, far side on the other; paste and mask are expansions set on the pad)
CAPAE116103X105N [mm]
  rect 4.3x2.1 smd: 1(-4.425,0) 2(4.425,0)
  silkscreen extent -5.25,-5.25 5.25,5.25, body extent -5.5,-5.2 5.5,5.2, height 10.41
CAPC1005X06N [mm] "Chip Capacitor, 2-Leads, Body 1,00x0,50mm, IPC Medium Density"
  rect 0.64x0.64 smd mask+0.05: 1(-0.46,0) 2(0.46,0)
  body extent -0.55,-0.3 0.55,0.3, height 0.6
CAPC1608X08L [mm] "Chip Capacitor, 2-Leads, Body 1,60x0,80mm, IPC High Density"
  rect 0.8x0.85 smd mask+0.08: 1(-0.6,0) 2(0.6,0)
  body extent -0.85,-0.45 0.85,0.45, height 0.8
CAPC2012X12L [mm] "Chip Capacitor, 2-Leads, Body 2,00x1,25mm, IPC High Density"
  rect 1x1.3 smd mask+0.05: 1(-0.75,0) 2(0.75,0)
  body extent -1.05,-0.67 1.05,0.67, height 1.25
CAPC3216X19L [mm] "Chip Capacitor, 2-Leads, Body 3,20x1,60mm, IPC High Density"
  rect 1.15x1.7 smd: 1(-1.3,0) 2(1.3,0)
  silkscreen extent -0.35,-0.75 0.35,0.75, body extent -1.68,-0.87 1.68,0.87, height 1.9
CAPC3225X27L [mm] "Chip Capacitor, 2-Leads, Body 3,20x2,50mm, IPC High Density"
  rect 1.05x2.55 smd: 1(-1.325,0) 2(1.325,0)
  silkscreen extent -0.4,-1.17 0.4,1.18, body extent -1.6,-1.25 1.6,1.25, height 2.7
CAPMP7343X28L [mm] "Molded Capacitor, 2-Leads, Body 7.30x4.30mm, IPC High Density"
  rect 1.7x2.35 smd: 1(-3.05,0) 2(3.05,0)
  silkscreen extent -3.9,-2.4 4.62,2.4, body extent -3.8,-2.3 3.8,2.3, height 3.1
Coilcraft-1008CS [mm] "Ceramic Chip Inductors"
  rect 1.02x2.54 smd: 1(-1.18,0) 2(1.18,0)
  silkscreen extent -1.95,-1.9 1.95,1.9, body extent -1.46,-1.4 1.46,1.39, height 2.01
Coilcraft-1812FS [mm]
  rect 1.14x3.05 smd: 1(-2.07,0) 2(2.07,0)
  silkscreen extent -3.02,-2.63 3.03,2.58, body extent -2.99,-2.59 2.89,2.39, height 3.81
CSAB0420 [mm] "Wire Wound Inductor, 2-Leads,"
  rect 1.5x2.5 smd: 1(-1.85,0) 2(1.85,0)
  silkscreen extent -2.4,-2.3 2.4,2.2, body extent -2.35,-2.1 2.35,2.1, height 1.85
FH12-10S-0.5SH [mm] "FFC/FPC Connector 10 Circuits"
  rect 1.8x2.2 smd mask+0.051: 0(-4.15,-3.35) 0(4.15,-3.35)
  rect 0.25x1.5 smd mask+0.051: 1(-2.25,0) 2(-1.75,0) 3(-1.25,0) 4(-0.75,0) 5(-0.25,0) 6(0.25,0) 7(0.75,0) 8(1.25,0) 9(1.75,0) 10(2.25,0)
  silkscreen extent -5.35,-6.95 5.35,1.02, body extent -4.55,-6.35 4.55,0.05, height 2.14
HDR1X6 [mm]
  rect 1.5x1.5 hole 0.9: 1(0,0)
  round 1.5 hole 0.9: 2(2.54,0) 3(5.08,0) 4(7.62,0) 5(10.16,0) 6(12.7,0)
  silkscreen extent -1.27,-1.27 13.97,1.27, body extent -1.25,-1.22 13.89,1.28, height 8.2
"IM Relay GR" [mm] "AXICOM"
  rrect20% 0.7x2 smd: 1(0,-3) 2(3.2,-3) 3(5.4,-3) 4(7.6,-3) 5(7.6,3) 6(5.4,3) 7(3.2,3) 8(0,3)
  silkscreen extent -2.14,-4.27 8.95,4.22, body extent -1.2,-3.76 8.8,3.76, height 5.65
INDC0805CS [mm] "Chip Inductor, 2-Leads, Body 2.29x1.73mm, IPC High Density"
  rect 1.02x1.78 smd: 1(-0.89,0) 2(0.89,0)
  silkscreen extent -0.2,-0.78 0.2,0.78, body extent -1.14,-0.86 1.14,0.86, height 1.51
INDC1608X08L [mm] "Chip Inductor, 2-Leads, Body 1,60x0,80mm, IPC High Density"
  rect 0.69x0.84 smd: 1(-0.63,0) 2(0.63,0)
  body extent -0.8,-0.4 0.8,0.4, height 0.95
QFN50P400X400X80_HS-21L [mm] "QFN, 20-Leads, Body 4,00x4,00mm, Pitch 0,50mm, Thermal Pad 2,15x2,15mm, IPC High Density"
  oval 1x0.25 smd mask+0.05: 1(-1.75,1) 2(-1.75,0.5) 3(-1.75,0) 4(-1.75,-0.5) 5(-1.75,-1) 11(1.75,-1) 12(1.75,-0.5) 13(1.75,0) 14(1.75,0.5) 15(1.75,1)
  oval 0.25x1 smd mask+0.05: 6(-1,-1.75) 7(-0.5,-1.75) 8(0,-1.75) 9(0.5,-1.75) 10(1,-1.75) 16(1,1.75) 17(0.5,1.75) 18(0,1.75) 19(-0.5,1.75) 20(-1,1.75)
  rect 2.15x2.15 smd mask+0.05: 21(0,0)
  silkscreen extent -2.97,-2.2 2.2,2.2, body extent -2.01,-1.98 1.99,2.02, height 1
QFN65P500X500X100_HS-21L [mm] "QFN, 20-Leads, Body 5,00x5,00mm, Pitch 0,65mm, Thermal Pad 3,15x3,15mm, IPC High Density"
  oval 0.8x0.25 smd mask+0.07: 1(-2.375,1.3) 2(-2.375,0.65) 3(-2.375,0) 4(-2.375,-0.65) 5(-2.375,-1.3) 11(2.375,-1.3) 12(2.375,-0.65) 13(2.375,0) 14(2.375,0.65) 15(2.375,1.3)
  oval 0.25x0.8 smd mask+0.07: 6(-1.3,-2.375) 7(-0.65,-2.375) 8(0,-2.375) 9(0.65,-2.375) 10(1.3,-2.375) 16(1.3,2.375) 17(0.65,2.375) 18(0,2.375) 19(-0.65,2.375) 20(-1.3,2.375)
  rect 3.15x3.15 smd mask+0.07: 21(0,0)
  silkscreen extent -3.5,-2.73 2.73,2.72, body extent -2.66,-2.66 2.66,2.66, height 1
QFP50P1200X1200X160-64N [mm]
  rrect50% 1.49x0.28 smd: 1(-5.67,3.75) 2(-5.67,3.25) 3(-5.67,2.75) 4(-5.67,2.25) 5(-5.67,1.75) 6(-5.67,1.25) 7(-5.67,0.75) 8(-5.67,0.25) 9(-5.67,-0.25) 10(-5.67,-0.75) 11(-5.67,-1.25) 12(-5.67,-1.75) 13(-5.67,-2.25) 14(-5.67,-2.75) 15(-5.67,-3.25) 16(-5.67,-3.75) 33(5.67,-3.75) 34(5.67,-3.25) 35(5.67,-2.75) 36(5.67,-2.25) 37(5.67,-1.75) 38(5.67,-1.25) 39(5.67,-0.75) 40(5.67,-0.25) 41(5.67,0.25) 42(5.67,0.75) 43(5.67,1.25) 44(5.67,1.75) 45(5.67,2.25) 46(5.67,2.75) 47(5.67,3.25) 48(5.67,3.75)
  rrect50% 0.28x1.49 smd: 17(-3.75,-5.67) 18(-3.25,-5.67) 19(-2.75,-5.67) 20(-2.25,-5.67) 21(-1.75,-5.67) 22(-1.25,-5.67) 23(-0.75,-5.67) 24(-0.25,-5.67) 25(0.25,-5.67) 26(0.75,-5.67) 27(1.25,-5.67) 28(1.75,-5.67) 29(2.25,-5.67) 30(2.75,-5.67) 31(3.25,-5.67) 32(3.75,-5.67) 49(3.75,5.67) 50(3.25,5.67) 51(2.75,5.67) 52(2.25,5.67) 53(1.75,5.67) 54(1.25,5.67) 55(0.75,5.67) 56(0.25,5.67) 57(-0.25,5.67) 58(-0.75,5.67) 59(-1.25,5.67) 60(-1.75,5.67) 61(-2.25,5.67) 62(-2.75,5.67) 63(-3.25,5.67) 64(-3.75,5.67)
  silkscreen extent -5.85,-5 5,5, body extent -6,-6 6,6, height 0.72
RESC1005X06N [mm] "Chip Resistor, 2-Leads, Body 1,00x0,50mm, IPC Medium Density"
  rect 0.6x0.6 smd mask+0.05: 1(-0.45,0) 2(0.45,0)
  body extent -0.55,-0.3 0.55,0.3, height 0.6
RESC2012X05L [mm] "Chip Resistor, 2-Leads, Body 2,00x1,25mm, IPC High Density"
  rect 0.6x1.2 smd mask+0.05: 1(-0.875,0) 2(0.875,0)
  silkscreen extent -0.2,-0.5 0.2,0.5, body extent -1,-0.63 1,0.63, height 0.5
RESC3216X04L [mm] "Chip Resistor, 2-Leads, Body 3,20x1,60mm, IPC High Density"
  rect 1.5x1.8 smd: 1(-1.25,0) 2(1.25,0)
  body extent -1.68,-0.87 1.68,0.87, height 0.44
"SM-22 package" [mm] "SM22, 5-Leads, Body 3,81x3,81mm, Pitch 1,25mm, IPC High Density"
  rect 1.4x0.76 smd: 1(-1.77,-1.25) 2(-1.77,0) 3(-1.77,1.25) 4(1.77,1.25) 5(1.77,-1.25)
  silkscreen extent -1.9,-2.28 0.76,1.9, body extent -2.41,-1.9 2.41,1.91, height 2.6
SMA-JR [mm] "Connector; RF Coaxial, SMA, SM; 5 Position; Vertical - Large Pad Version"
  round 2.2 hole 1.5: 1(0,0) 2(-2.54,2.54) 2(-2.4,-2.4) 2(2.54,2.54) 2(2.54,-2.54)
  silkscreen extent -3.17,-3.17 3.17,3.17, body extent -3.5,-11.6 3.5,3.5, height 10.16
SON40P300X80_HS-15L [mm] "SON, 14-Leads, Body 3.00x3.00mm, Pitch 0.40mm, Thermal Pad 2.30x1.69mm, IPC High Density"
  rect 0.7x0.2 smd mask+0.075: 1(-1.395,1.2) 2(-1.395,0.8) 3(-1.395,0.4) 4(-1.395,0) 5(-1.395,-0.4) 6(-1.395,-0.8) 7(-1.395,-1.2) 8(1.395,-1.2) 9(1.395,-0.8) 10(1.395,-0.4) 11(1.395,0) 12(1.395,0.4) 13(1.395,0.8) 14(1.395,1.2)
  rect 1.69x2.3 smd mask+0.075: 15(0,0)
  silkscreen extent -2,-1.7 1.55,1.75, body extent -1.5,-1.5 1.5,1.5, height 0.73
SON50P160X65_HS-9N [mm] "SON, 8-Leads, Body 2,10x1,60mm, Pitch 0,50mm, Thermal Pad 1,68x0,33mm, IPC Medium Density"
  rect 0.63x0.25 smd mask+0.05: 1(-0.765,0.75) 2(-0.765,0.25) 3(-0.765,-0.25) 4(-0.765,-0.75) 5(0.765,-0.75) 6(0.765,-0.25) 7(0.765,0.25) 8(0.765,0.75)
  rect 0.33x1.68 smd mask+0.05: 9(0,0)
  silkscreen extent -1.3,-1.25 0.85,1.3, body extent -0.85,-1.1 0.85,1.1, height 0.65
SOT23-5AM [mm] "SOT23, 5-Leads, Body 2.9x1.7mm, Pitch 0.95mm, Lead Span 2.8mm, IPC Low Density"
  rect 1.3x0.6 smd: 1(-1.2,0.95) 2(-1.2,0) 3(-1.2,-0.95) 4(1.2,-0.95) 5(1.2,0.95)
  silkscreen extent -1.33,-1.55 0.15,1.97, body extent -1.5,-1.5 1.5,1.5, height 1.3
SOT23_N [mm] "SOT23, 3-Leads, Body 2.9x1.3mm, Pitch 0.95mm, Lead Span 2.3mm, IPC Medium Density"
  rect 1.3x0.6 smd: 1(-1.05,0.95) 2(-1.05,-0.95) 3(1.05,0)
  silkscreen extent -1.17,-1.5 0.7,1.93, body extent -1.25,-1.46 1.23,1.46, height 1
SOT89-150P330X160-3N [mm] "SOT89, 3-Leads, Body 4,40x2,50mm, Pitch 1,50mm, Lead Span 3,3mm, IPC Medium Density"
  rect 1.2x0.6 smd: 1(-1.5,1.5) 3(-1.5,-1.5)
  rect 1.4x0.6 smd: 2(-1.425,0)
  Top Layer region: -0.925,0.3 -0.3,0.9 1.5,0.9 2.1,0.3 2.1,-0.3 1.5,-0.9 -0.3,-0.9 -0.925,-0.275
  silkscreen extent -1.83,-2.25 1.55,2.47, body extent -1.9,-2.25 2.1,2.25, height 1.6
SOT95P270X145-6N [mm] "SOT23, 6-Leads, Body 2,90x2,70mm, Pitch 0,95mm, IPC Medium Density"
  rect 1.05x0.6 smd: 1(-1.425,0.95) 2(-1.425,0) 3(-1.425,-0.95) 4(1.425,-0.95) 5(1.425,0) 6(1.425,0.95)
  silkscreen extent -1.55,-1.55 0.5,1.92, body extent -1.7,-1.55 1.7,1.55, height 1.45
TO-220HS [mm]
  rect 1.5x4 smd: 1(-2.5,0) 2(0,0) 3(2.5,0)
  silkscreen extent -5.43,-1.75 5.4,20.73, body extent -5.06,-1.84 5.1,20.52, height 1.6
TRANSFORMER_KV_PA20_0UT_2XBN-43-302_V1 [mm] "2xBN-43-302, 10,3x13,3x7,5 mm, hole d 3,8 mm"
  rrect50% 4x2 smd: 1(14.65,4.5) 2(14.25,0) 3(14.65,-4.5)
  rrect50% 4x3 smd: 4(-14,-3.5) 5(-14,3.5)
  silkscreen extent -10.3,-6.75 10.3,6.75, body extent -13.68,-6.65 16.42,6.65, height 7.5
TSOP65P210X100-6L [mm] "TSOP, 6-Leads, Body 2,00x1,25mm, Pitch 0,65mm, IPC High Density"
  rect 0.65x0.4 smd: 1(-1.025,0.65) 2(-1.025,0) 3(-1.025,-0.65) 4(1.025,-0.65) 5(1.025,0) 6(1.025,0.65)
  silkscreen extent -1.15,-1.1 0.3,1.52, body extent -1.05,-1 1.05,1, height 0.92
XT30UPB-M [mm]
  round 4 hole 2: 1(-2.5,0) 2(2.5,0)
  silkscreen extent -5.23,-2.73 5.28,2.75, body extent -5.07,-2.6 5.13,2.6, height 9.4

## Part data
C1 C4 C5 C7 C8 C10 C11 C16 C17 C21 C22 C23 C24 C25 C26 C27 C28 C29 C30 C31 C34 C41 C42 C43 C44 C45 C46 C47 C48 C49 C52 C55 C57 C58 C59 C60 C62 C63 C64 C65 C66 C67 C69 C70 C71 C72 C75 C76 C77 C78 C81 C82 C83 C84 C85 C87 C88 C89 C103 C107 C108 C109 C110 C111 C112 C115 C116 C117 C118 C119 C121 C123 C125 C126 C130 C134 C138 C139 C147 C148 C150 C151 C162 C163 C164 C166 C167 C168 C169 C170 C171 C172 C175 C177 C178 C179 C180 C182 C183 C208: library part "Кер.ЧИП конд. 0402 0.1мкФ X7R 10%, 16В", "Кер. ЧИП-конденсатор", Power/Voltage=16В, Tolerance=±10%, PackageReference=0402, TKE=X7R
C2 C3: library part "Кер.ЧИП конд. 0402 15пФ NPO 5%, 50В", "Кер. ЧИП-конденсатор", Power/Voltage=50В, Tolerance=±5%, PackageReference=0402, TKE=NPO
C6 C136 C173 C174 C207: library part "Кер.ЧИП конд. 0402 180пФ NPO 5%, 50В", "Кер. ЧИП-конденсатор", Power/Voltage=50В, Tolerance=±5%, PackageReference=0402, TKE=NPO
C9 C14 C15 C50 C51 C68 C90 C137 C140 C141: library part "Кер.ЧИП конд. 0402 100пФ NPO 5%, 50В", "Кер. ЧИП-конденсатор", Power/Voltage=50В, Tolerance=±5%, PackageReference=0402, TKE=NPO
C12: library part "Кер.ЧИП конд. 0402 13пФ NPO 5%, 50В", "Кер. ЧИП-конденсатор", Power/Voltage=50В, Tolerance=±5%, PackageReference=0402, TKE=NPO
C13: library part "Кер.ЧИП конд. 0402 43пФ NPO 5%, 50В", "Кер. ЧИП-конденсатор", Power/Voltage=50В, Tolerance=±5%, PackageReference=0402, TKE=NPO
C18 C203: library part "Кер.ЧИП конд. 0402 56пФ NPO 5%, 50В", "Кер. ЧИП-конденсатор", Power/Voltage=50В, Tolerance=±5%, PackageReference=0402, TKE=NPO
C19 C199: library part "Кер.ЧИП конд. 0402 91пФ NPO 5%, 50В", "Кер. ЧИП-конденсатор", Power/Voltage=50В, Tolerance=±5%, PackageReference=0402, TKE=NPO
C20: library part "Кер.ЧИП конд. 0402 39пФ NPO 5%, 50В", "Кер. ЧИП-конденсатор", Power/Voltage=50В, Tolerance=±5%, PackageReference=0402, TKE=NPO
C32 C33 C205: library part "Кер.ЧИП конд. 0402 220пФ NPO 5%, 50В", "Кер. ЧИП-конденсатор", Power/Voltage=50В, Tolerance=±5%, PackageReference=0402, TKE=NPO
C35: library part "Кер.ЧИП конд. 0402 47пФ NPO 5%, 50В", "Кер. ЧИП-конденсатор", Power/Voltage=50В, Tolerance=±5%, PackageReference=0402, TKE=NPO
C36 C135: library part "Кер.ЧИП конд. 0402 120пФ NPO 5%, 50В", "Кер. ЧИП-конденсатор", Power/Voltage=50В, Tolerance=±5%, PackageReference=0402, TKE=NPO
C37 C56 C145: library part "Кер.ЧИП конд. 0402 820пФ NP0 5%, 50В", "Кер. ЧИП-конденсатор", Power/Voltage=50В, Tolerance=±5%, PackageReference=0402, TKE=NPO
C38 C40 C176: library part "Кер.ЧИП конд. 0402 1800пФ X7R 10%, 50В", "Кер. ЧИП-конденсатор", Power/Voltage=50В, Tolerance=±20%, TKE=X7R
C39 C86: library part "Кер.ЧИП конд. 0402 3300пФ X7R 10%, 50В", "Кер. ЧИП-конденсатор", Power/Voltage=50В, Tolerance=±20%, TKE=X7R
C53 C54 C142 C209: library part "Кер.ЧИП конд. 0402 1000пФ NP0 5%, 50В", "Кер. ЧИП-конденсатор", Power/Voltage=50В, Tolerance=±5%, PackageReference=0402, TKE=NPO
C61: library part "Кер.ЧИП конд. 0402 4700пФ X7R 10%, 50В", "Кер. ЧИП-конденсатор", Power/Voltage=50В, Tolerance=±20%, TKE=X7R
C73 C74 C114 C120 C124 C129 C133 C143 C158 C184 C185 C186 C187 C188 C189 C190 C191 C192 C193 C194 C195 C196 C197 C198: library part "Кер.ЧИП конд. 0402 0.01мкФ X7R 10%, 50В", "Кер. ЧИП-конденсатор", Power/Voltage=50В, Tolerance=±20%, TKE=X7R
C79 C80 C160: library part "Кер.ЧИП конд. 0402 560пФ NP0 5%, 50В", "Кер. ЧИП-конденсатор", Power/Voltage=50В, Tolerance=±5%, PackageReference=0402, TKE=NPO
C91 C93 C94 C95 C96 C106: library part "Кер.ЧИП конд. 0805 22мкФ X5R 10% 16В", "Кер. ЧИП-конденсатор", Manufacturer=TDK, ManufacturerPartNumber=C2012X5R1C226KT, Power/Voltage=16В, Tolerance=±10%, TKE=X5R
C92 C156: library part "Конденсатор гибридный SMD 470мкФ ±20% 25В", "Гибридный ЧИП-конденсатор", Manufacturer=Panasonic, ManufacturerPartNumber=EEHZK1E471P, Power/Voltage=25В, Tolerance=±20%, LatestRevisionDate=29-May-2009, LatestRevisionNote="IPC-7351 Footprint Added.", PackageDescription="ZK series", PackageReference="ZK series", Published=8-Jun-2000, Publisher="Altium Limited"
C97 C100 C105 C113: library part "Кер.ЧИП конд. 0402 1мкФ X5R 10%, 10В", "Кер. ЧИП-конденсатор", Power/Voltage=10В, Tolerance=±10%, PackageReference=0402, TKE=X5R
C98 C210: library part "Кер.ЧИП конд. 1206 47пФ NP0 5% 2000В", "Кер. ЧИП-конденсатор", Manufacturer=WALSIN, ManufacturerPartNumber=1206N470J202, Power/Voltage=2000В, Tolerance=±5%, TKE=NP0
C99: library part "Конденсатор танталовый SMD D case 47мкФ ±10% 25B", "Тант. ЧИП-конденсатор", Power/Voltage=25В, Tolerance=±10%, LatestRevisionDate=29-May-2009, LatestRevisionNote="IPC-7351 Footprint Added.", PackageDescription="Chip Capacitor", PackageReference="тип D", Published=8-Jun-2000, Publisher="Altium Limited"
C101: library part "Кер.ЧИП конд. 1206 100мкФ X5R 20% 6.3В", "Кер. ЧИП-конденсатор", Manufacturer=Murata, ManufacturerPartNumber=GRM31CR60J107ME39L, Power/Voltage=6.3В, Tolerance=±20%, TKE=X5R
C102: library part "Кер.ЧИП конд. 0603 10мкФ X5R 20% 6.3В", "Кер. ЧИП-конденсатор", Manufacturer=Murata, ManufacturerPartNumber=GRM188R61A106KE69D, Power/Voltage=6.3В, Tolerance=±20%, TKE=X5R
C104: library part "Кер.ЧИП конд. 0805 47мкФ X5R 20% 10В", "Кер. ЧИП-конденсатор", Manufacturer=Murata, ManufacturerPartNumber=GRM21BR61A476ME15L, Power/Voltage=10В, Tolerance=±20%, TKE=X5R
C122 C144 C149 C157: library part "Кер.ЧИП конд. 1210 10мкФ X5R 20% 50В", "Кер. ЧИП-конденсатор", Manufacturer=Murata, ManufacturerPartNumber=GRM32ER71H106, Power/Voltage=50В, Tolerance=±20%, TKE=X5R
C127 C131 C132 C152 C153 C154: library part "Кер.ЧИП конд. 0603 0.1мкФ X7R 10% 50В", "Кер. ЧИП-конденсатор", Manufacturer=Murata, ManufacturerPartNumber=GRM188R71H104KA93D, Power/Voltage=50В, Tolerance=±10%, TKE=X7R
C128: library part "Кер.ЧИП конд. 0402 27пФ NPO 5%, 50В", "Кер. ЧИП-конденсатор", Power/Voltage=50В, Tolerance=±5%, PackageReference=0402, TKE=NPO
C146 C155: library part "Кер.ЧИП конд. 0805 0,01 мкФ X7R 10% 250В", "Кер. ЧИП-конденсатор", Manufacturer=Murate, ManufacturerPartNumber=GRM21BR72E103KW03, Power/Voltage=250В, Tolerance=±10%, TKE=X7R
C159: library part "Кер.ЧИП конд. 0402 680пФ NP0 5%, 50В", "Кер. ЧИП-конденсатор", Power/Voltage=50В, Tolerance=±5%, PackageReference=0402, TKE=NPO
C161: library part "Кер.ЧИП конд. 0402 390пФ NP0 5%, 50В", "Кер. ЧИП-конденсатор", Power/Voltage=50В, Tolerance=±5%, PackageReference=0402, TKE=NPO
C165: library part "Кер.ЧИП конд. 0402 1200пФ X7R 10%, 50В", "Кер. ЧИП-конденсатор", Power/Voltage=50В, Tolerance=±20%, TKE=X7R
C181: library part "Кер.ЧИП конд. 0402 18пФ NPO 5%, 50В", "Кер. ЧИП-конденсатор", Power/Voltage=50В, Tolerance=±5%, PackageReference=0402, TKE=NPO
C200: library part "Кер.ЧИП конд. 0402 68пФ NPO 5%, 50В", "Кер. ЧИП-конденсатор", Power/Voltage=50В, Tolerance=±5%, PackageReference=0402, TKE=NPO
C201: library part "Кер.ЧИП конд. 0402 470пФ NP0 5%, 50В", "Кер. ЧИП-конденсатор", Power/Voltage=50В, Tolerance=±5%, PackageReference=0402, TKE=NPO
C202: library part "Кер.ЧИП конд. 0402 12пФ NPO 5%, 50В", "Кер. ЧИП-конденсатор", Power/Voltage=50В, Tolerance=±5%, PackageReference=0402, TKE=NPO
C204: library part "Кер.ЧИП конд. 0402 82пФ NPO 5%, 50В", "Кер. ЧИП-конденсатор", Power/Voltage=50В, Tolerance=±5%, PackageReference=0402, TKE=NPO
C206: library part "Кер.ЧИП конд. 0402 22пФ NPO 5%, 50В", "Кер. ЧИП-конденсатор", Power/Voltage=50В, Tolerance=±5%, PackageReference=0402, TKE=NPO
D1: library part "Микросхема STM32F103RCT6", "Ultra-low-power 32-bit MCU ARM®-based Cortex®-M3, 128KB Flash, 16KB SRAM, 4KB EEPROM, LCD, USB, ADC, DAC", Manufacturer=STMicroelectronics, Code_JEDEC=MS-026, ComponentLink1Description="Manufacturer Link", ComponentLink3Description="Packaging Specification", Published=29-Jan-2009
DA1 DA2 DA4 DA5 DA6 DA7 DA8 DA9 DA10 DA11 DA12 DA13 DA14 DA15 DA16 DA17 DA18 DA19 DA20: library part "Микросхема AS169-73", "PHEMT GaAs IC SPDT Switch 300 kHz–2.5 GHz", Manufacturer=Qorvo, ComponentLink1Description="product page", ComponentLink1URL=https://www.skyworksinc.com/Products/switches/AS169-73LF
DA3 DA27: library part "Микросхема PE4312C-Z", "RF Digital Step Attenuator 6-bit, 31.5 dB, 1 MHz–4 GHz", Manufacturer=Peregrine, ComponentLink1Description=datasheet, ComponentLink1URL=https://www.psemi.com/pdf/datasheets/pe4312ds.pdf
DA21 DA23: library part "Микросхема TPS7A4700RGW", "36-V, 1-A, 4-µVRMS, RF LDO Voltage Regulator", Manufacturer=TI, ComponentLink1Description=datasheet, ComponentLink1URL=http://www.ti.com/lit/ds/symlink/tps7a47.pdf
DA22: library part "Микросхема LP5907MFX-3.3", "250-mA Ultra-Low-Noise, Low-IQ LDO", Manufacturer=TI, ComponentLink1Description=datasheet, ComponentLink1URL=http://www.ti.com/lit/ds/symlink/lp5907.pdf
DA25 DA28: library part "ЧИП регулятор TLVH431AIDBZR", "Low-Voltage Adjustable Precision Shunt Regulator", Manufacturer=TI, Power/Voltage="1.24В до 18В", ComponentLink1Description=datasheet, ComponentLink1URL=https://www.ti.com/lit/ds/symlink/tlvh431a.pdf?ts=1606914625003&ref_url=https%253A%252F%252Fwww.google.com%252F, ManufacturerPartNumber=TLVH431AIDBZR
DA29: library part "Микросхема MAX4231AXT-T", "High-Output-Drive, 10MHz, 10V/μs,  Rail-to-Rail I/O Op Amps with Shutdown in SC70", Manufacturer=MAXIM, ComponentLink1Description=datasheet, ComponentLink1URL=https://datasheets.maximintegrated.com/en/ds/MAX4230-MAX4234.pdf
DD1: library part "Микросхема MAX13433EETD+", "RS-422 Transceivers with Low-Voltage Logic Interface 16M", Manufacturer=Maxim, ComponentLink1Description=datasheet, ComponentLink1URL=https://datasheets.maximintegrated.com/en/ds/MAX13430E-MAX13433E.pdf
K1: library part "Реле IM06GR", "Signal Relay 12VDC", ComponentLink1Description=datasheet, ComponentLink1URL=https://www.te.com/commerce/DocumentDelivery/DDEController?Action=srchrtrv&DocNm=1-1773734-7_IM_Relay_I_Type&DocType=DS&DocLang=English
L1 L2: library part "ЧИП индуктивность 0805CS-561X"
L3 L8 L9 L13: library part "ЧИП индуктивность 1008CS-562X_", "Chip Inductors–1008CS Series (2520)", Manufacturer=Сoilcraft, ManufacturerPartNumber=1008CS-562X_E_
L4: library part "ЧИП индуктивность 0805CS-470X"
L5 L40 L41 L45: library part "ЧИП дроссель 0603 BLM18PG121SN1D", "SMD EMI Suppression Filter EMIFIL", Manufacturer=Murata, ManufacturerPartNumber=BLM18PG121SN1D
L6: library part "ЧИП индуктивность 0805CS-151XGL"
L7: library part "ЧИП индуктивность 0805CS-111XGL"
L10 L11 L18 L19: library part "ЧИП индуктивность 0805CS-102X"
L12: library part "ЧИП индуктивность 0805CS-271X"
L14: library part "ЧИП индуктивность 1008CS-122X", "Chip Inductors–1008CS Series (2520)", Manufacturer=Сoilcraft, ManufacturerPartNumber=1008CS-122X
L15: library part "ЧИП индуктивность 1008CS-392X", "Chip Inductors–1008CS Series (2520)", Manufacturer=Сoilcraft, ManufacturerPartNumber=1008CS-391X_E_
L16: library part "ЧИП индуктивность 1008CS-392X", "Chip Inductors–1008CS Series (2520)", Manufacturer=Сoilcraft, ManufacturerPartNumber=1008CS-392X_E_
L17 L26: library part "ЧИП индуктивность 0805CS-681X"
L20 L21: library part "ЧИП индуктивность 0805CS-471X"
L22 L23: library part "ЧИП индуктивность 0805CS-121X"
L24: library part "ЧИП индуктивность 0805CS-152X"
L25: library part "ЧИП индуктивность 0805CS-182X", "Chip Inductors – 0805CS (2012)", Manufacturer=Сoilcraft, ManufacturerPartNumber=1812PS-683KLC
L27 L28: library part "ЧИП индуктивность 0805CS-222X"
L29: library part "ЧИП индуктивность 0805CS-221XGL"
L30 L39 L42 L46 L49 L50: library part "ЧИП индуктивность CSAB0420-2R2M", "Molding Power Choke", Manufacturer=Vishay, ManufacturerPartNumber=IHLP1616ABER1R0M11
L44 L47: library part "ЧИП индуктивность 1812FS-153", "High SRF, High Current Inductors", Manufacturer=Сoilcraft, ManufacturerPartNumber=1812PS-683KLC
R1 R2 R5 R6 R8 R9 R10 R11 R12 R13 R14 R15 R16 R17 R18 R19 R20 R21 R22 R23 R24 R25 R31 R34 R36 R38 R41 R42 R43 R53 R54 R68 R70 R72 R73 R74 R75 R76 R77 R78 R79 R80 R81 R82 R83 R84: library part "Чип резистор 0402 100 Ом, 5%", "ЧИП-резистор", Tolerance=±5%, PackageReference=0402, TKE="100 ppm/°С"
R3 R4 R7 R35 R37 R49 R52 R55 R69: library part "Чип резистор 0402 10 кОм, 5%", "ЧИП-резистор", Tolerance=±5%, PackageReference=0402, TKE="100 ppm/°С"
R26 R60 R61: library part "Чип резистор 0402 240 Ом, 5%", "ЧИП-резистор", Tolerance=±5%, PackageReference=0402, TKE="100 ppm/°С"
R32 R33: library part "Чип резистор 0402 180 кОм, 5%", "ЧИП-резистор", Tolerance=±5%, PackageReference=0402, TKE="100 ppm/°С"
R39: library part "Чип резистор 0402 0 Ом", "ЧИП-резистор", Tolerance=±5%, PackageReference=0402, TKE="100 ppm/°С"
R40 R71: library part "Чип резистор 0402 *", "ЧИП-резистор", Tolerance=±5%, PackageReference=0402, TKE="100 ppm/°С"
R44 R59: library part "Чип резистор 0402 3,3 кОм, 5%", "ЧИП-резистор", Tolerance=±5%, PackageReference=0402, TKE="100 ppm/°С"
R45 R56 R87 R88: library part "Чип резистор 0402 1 кОм, 5%", "ЧИП-резистор", Tolerance=±5%, PackageReference=0402, TKE="100 ppm/°С"
R46 R57: library part "Чип резистор 0402 2,2 кОм, 5%", "ЧИП-резистор", Tolerance=±5%, PackageReference=0402, TKE="100 ppm/°С"
R47 R48: library part "Чип резистор 0805 18 Ом, 5%", "ЧИП-резистор", Tolerance=±5%, PackageReference=0805, TKE="100 ppm/°С"
R50: library part "Чип резистор 0402 22 кОм, 5%", "ЧИП-резистор", Tolerance=±5%, PackageReference=0402, TKE="100 ppm/°С"
R51 R89: library part "Чип резистор 0402 10 Ом, 5%", "ЧИП-резистор", Tolerance=±5%, PackageReference=0402, TKE="100 ppm/°С"
R58: library part "Чип резистор 0402 39 кОм, 5%", "ЧИП-резистор", Tolerance=±5%, PackageReference=0402, TKE="100 ppm/°С"
R62 R66: library part "Чип резистор 1206 390 Ом, 5%", "ЧИП-резистор", Manufacturer=ROHM, Tolerance=±5%, PackageReference=1206, TKE="300 ppm/°С"
R63: library part "Чип резистор 0402 100 кОм, 5%", "ЧИП-резистор", Tolerance=±5%, PackageReference=0402, TKE="100 ppm/°С"
R64 R65: library part "Чип резистор 1206 1,5 кОм, 5%", "ЧИП-резистор", Manufacturer=ROHM, Tolerance=±5%, PackageReference=1206, TKE="300 ppm/°С"
R67: library part "Чип резистор 1206 100 кОм, 5%", "ЧИП-резистор", Manufacturer=ROHM, Tolerance=±5%, PackageReference=1206, TKE="300 ppm/°С"
R85 R86: library part "Чип резистор 0402 510 Ом, 5%", "ЧИП-резистор", Tolerance=±5%, PackageReference=0402, TKE="100 ppm/°С"
T1 T2 T3: library part "ЧИП трансформатор MABAES0060", "RF 1:1 Flux Coupled Transformer 0.3 - 200 MHz", Manufacturer=MACOM, ComponentLink1Description=datasheet, ComponentLink1URL=https://cdn.macom.com/datasheets/MABAES0060.pdf, ManufacturerPartNumber=MABAES0060
T4: library part Transformer_KV_PA20_OUT, "Трансформатор на 2 биноклях BN-43-302 (2843000302)mu850 / Первичная обмотка - плетенка ПМЛ2х4 / Вторичная обмотка - 2 витка проводом МГТФ 0,12", Manufacturer=НЕЛС, Manufacturer Part Number="Трансформатор PUM_OUT АНЕЛ.671143.003", Package="2xBN-43-302 (2843000302) 13.3x10.3 mm", SubType="Трансформатор на бинокле", TYPE=Трансформатор
VD1: library part "ЧИП диод BAS16", "High-speed switching diodes", Manufacturer=Nexperia, Power/Voltage=100В, ComponentLink1Description=datasheet, ComponentLink1URL=https://assets.nexperia.com/documents/data-sheet/BAS16_SER.pdf, ManufacturerPartNumber=BAS16
VT1 VT2: library part "ЧИП транзистор RD01MUS2", "Silicon MOSFET Power Transistor 520MHz, 1W, 7.2V", ComponentLink1Description=datasheet, ComponentLink1URL=https://www.mitsubishielectric.com/semiconductors/hf/products/datasheet/rd01mus2.pdf
VT3 VT4: library part "ЧИП транзистор RD06HHF1", "Silicon MOSFET Power Transistor 30MHz,6W", ComponentLink1Description=datasheet, ComponentLink1URL=https://www.radio-kits.co.uk/radio-related/Linear_PA/RD06HHF1_REV040402.pdf
VT6: library part "ЧИП транзистор PDTC114ET", "NPN resistor-equipped transistors;  R1 = 10 k, R2 = 10", ComponentLink1Description=datasheet, ComponentLink1URL=https://assets.nexperia.com/documents/data-sheet/PDTC114E_SER.pdf
XP1: library part "Соединитель XT30UPB-M", "AMASS XT30UPB-M  5 mm"
XP2 XP4: library part "Соединитель FH12-10S-0.5SVA", "0.5mm  Pitch FPC/FFC Connector FH12 Series", Manufacturer=Hirose
XP3: library part "Соединитель PLS-6", "Вилка штыревая 2.54мм 1x6 прямая тип1", LatestRevisionDate=17-Jul-2002, LatestRevisionNote="Re-released for DXP Platform.", Publisher="Altium Limited"